# Altium PCB Knob-v1.0.PcbDoc (part 1 of 3)
Units mil, origin at the board's own origin, x right, y up, seen from the top; angles counter-clockwise.
Board outline 3346.46 x 5475.65 mil, 2 copper layers (Top Layer, Bottom Layer), stack 61.811 mil thick; 109 components, 69 nets, 369 pads, 208 vias.
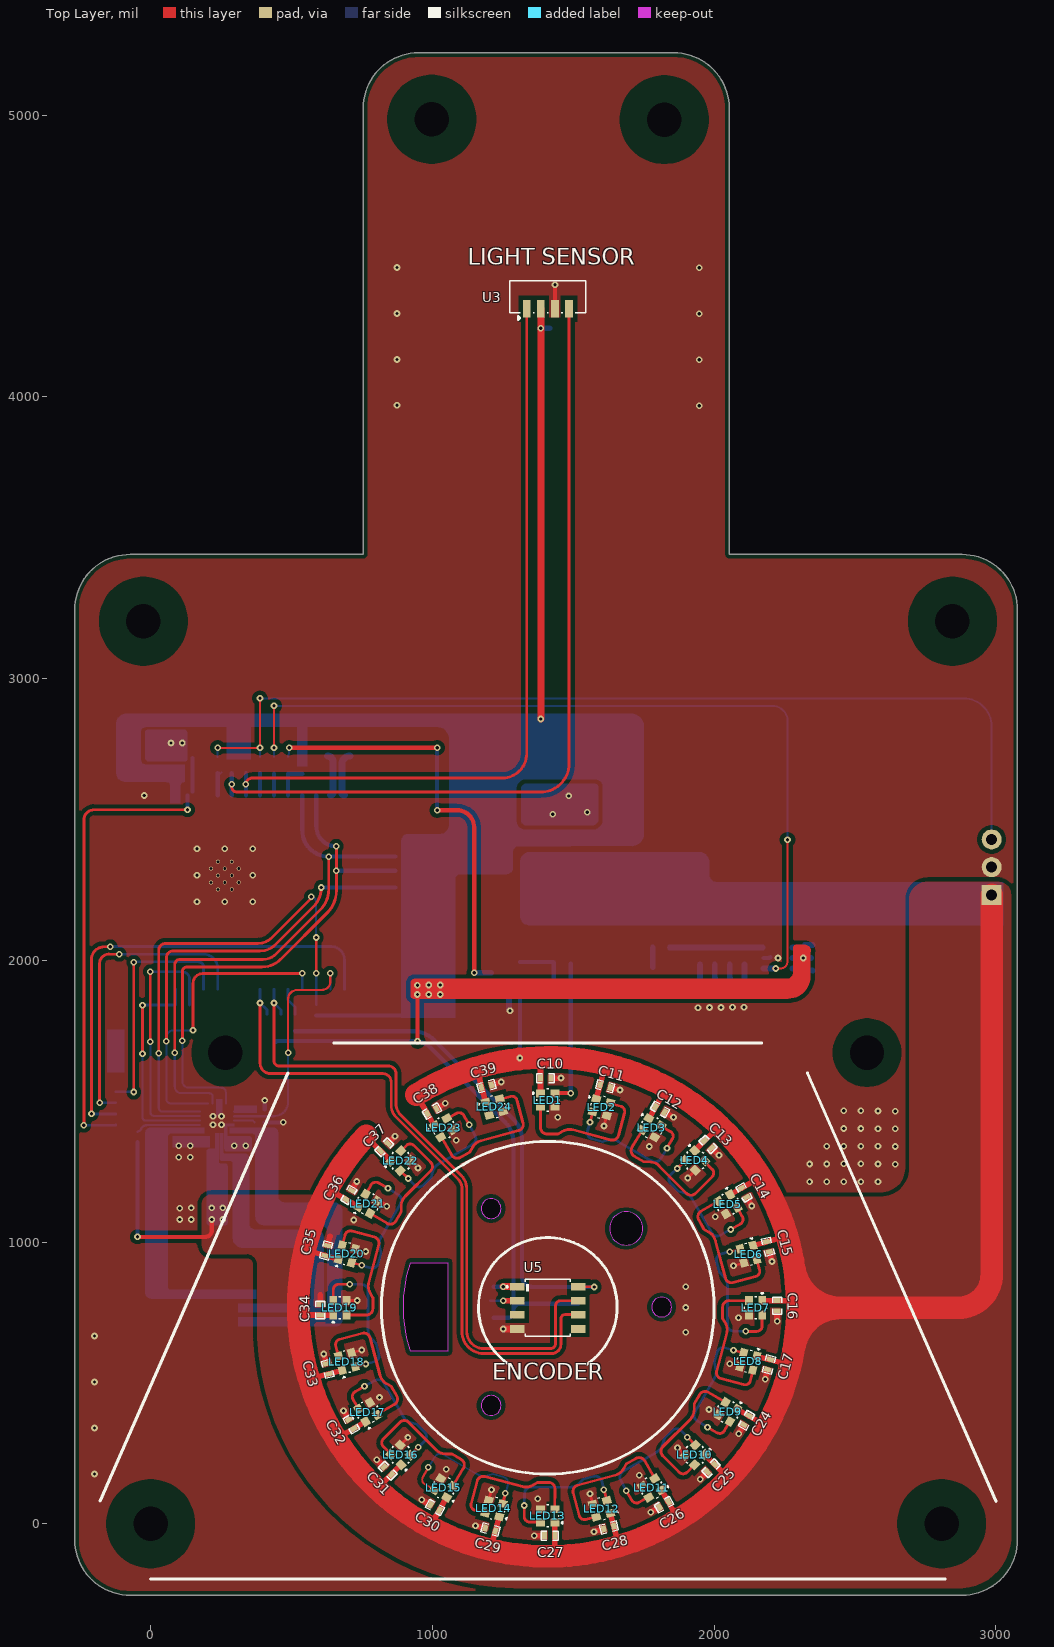
[diagram p0: Top Layer view]
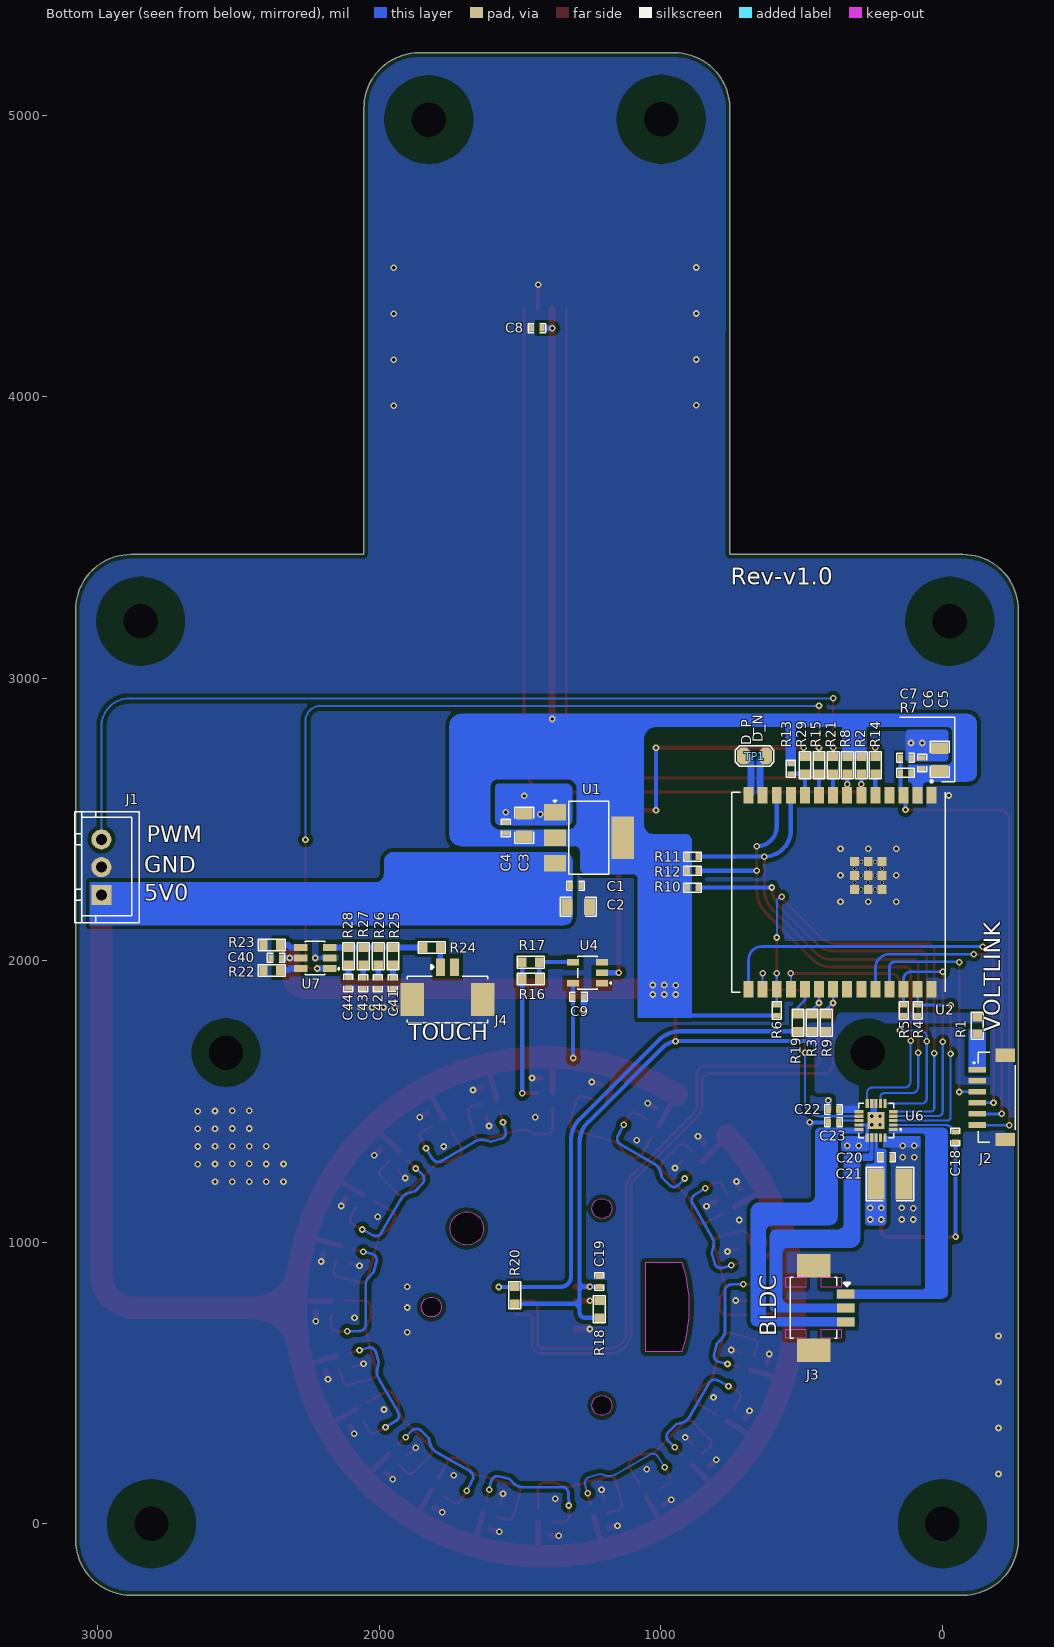
[diagram p1: Bottom Layer view, seen from below]
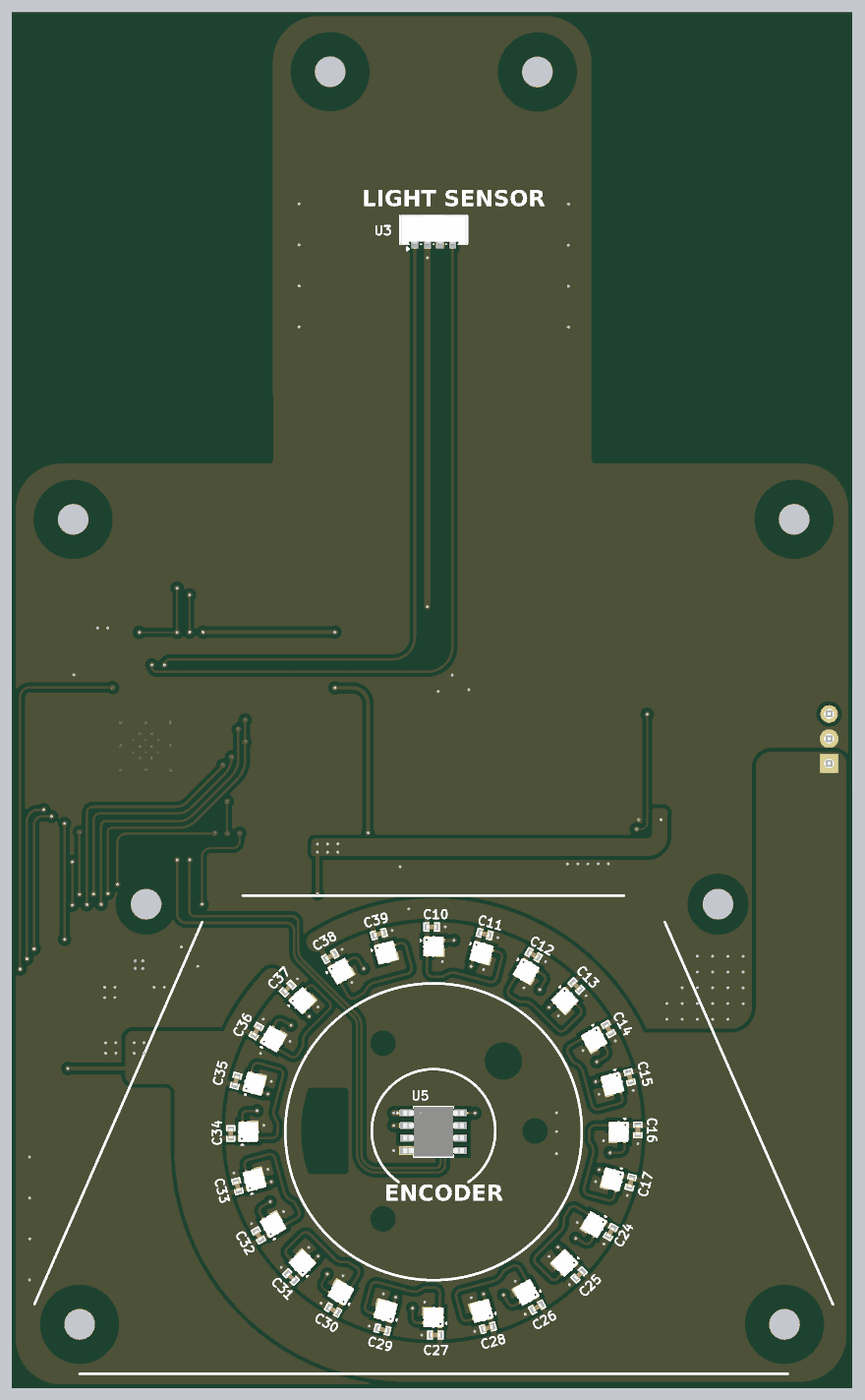
[diagram p3: 3D render of the assembled board from above, using the file's embedded part models]
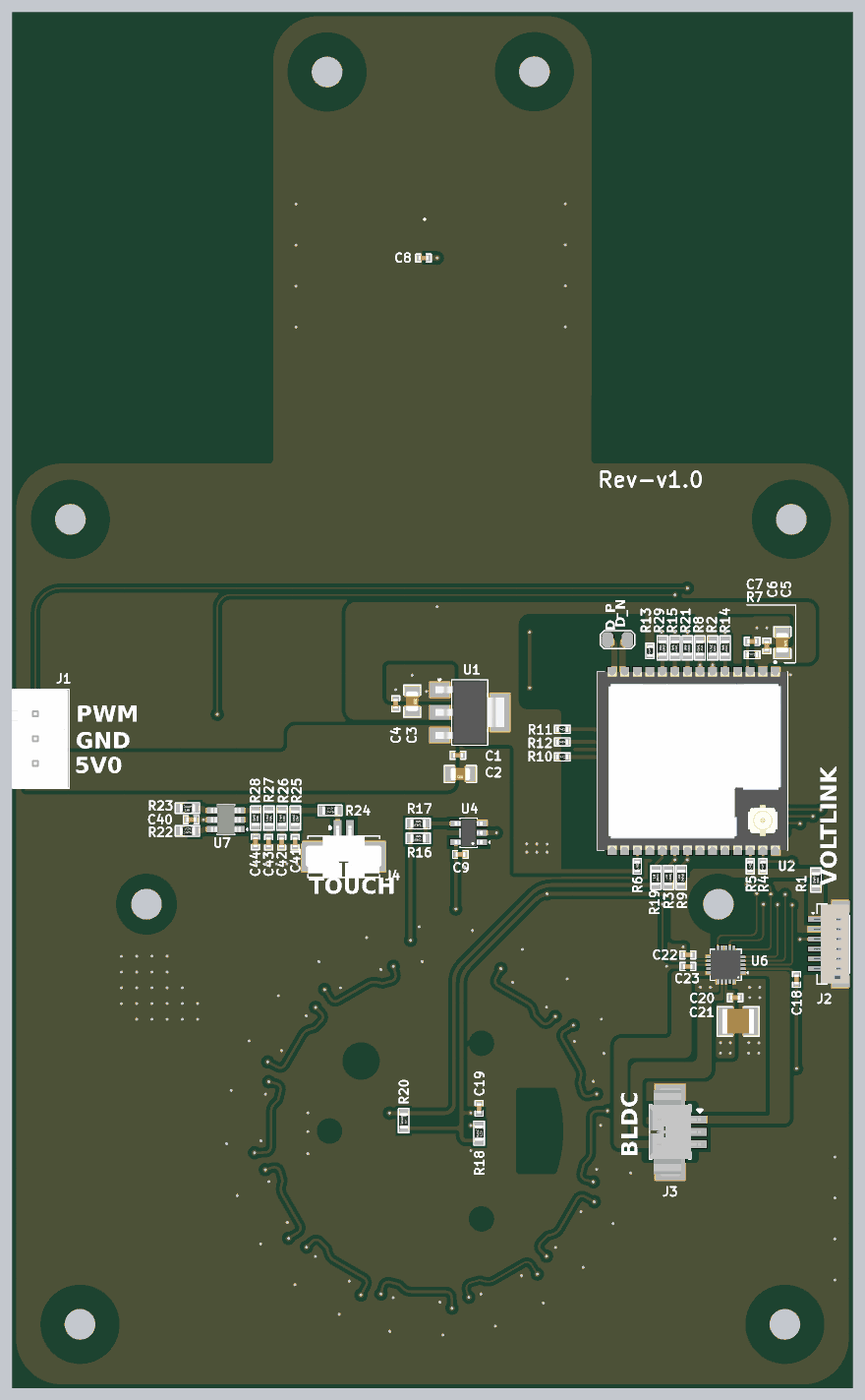
[diagram p4: 3D render of the assembled board from below, using the file's embedded part models]

## Layer stack, top to bottom
Top Solder: solder mask 0.4, Solder Resist, Dk 3.5
Top Layer: signal copper 1.378
Dielectric 1: dielectric 59.0551, FR-4, Dk 4.8
Bottom Layer: signal copper 1.378
Bottom Solder: solder mask 0.4, Solder Resist, Dk 3.5

## Board outline
-269.25,-57.09 -269.25,3244.09 cw(c-72.4,3244.09) -72.4,3440.94 755.22,3440.94 754.64,5024.78 cw(c951.49,5024.86) 951.49,5221.71 1857,5221.71 cw(c1857,5024.86) 2053.85,5024.87 2053.97,3440.94 2880.35,3440.94 cw(c2880.35,3244.09) 3077.2,3244.09 3077.2,-57.09 cw(c2880.35,-57.09) 2880.35,-253.94 -72.4,-253.94 cw(c-72.4,-57.09)
cut-out: 1778.57,769.23 ccw(c1814,769.23) 1814,733.8 ccw(c1814,769.23) 1849.44,769.23 ccw(c1814,769.23) 1814,804.66 ccw(c1814,769.23)
cut-out: 1173.2,419.72 ccw(c1208.64,419.72) 1208.64,384.29 ccw(c1208.64,419.72) 1244.07,419.72 ccw(c1208.64,419.72) 1208.64,455.16 ccw(c1208.64,419.72)
cut-out: 1173.2,1118.74 ccw(c1208.64,1118.74) 1208.64,1083.31 ccw(c1208.64,1118.74) 1244.07,1118.74 ccw(c1208.64,1118.74) 1208.64,1154.17 ccw(c1208.64,1118.74)
cut-out: 922.9,612.2 cw(c1409.88,769.68) 922.9,927.16 1055.55,927.16 1055.55,612.2
cut-out: 1629.22,1048.07 ccw(c1688.27,1048.07) 1688.27,989.02 ccw(c1688.27,1048.07) 1747.33,1048.07 ccw(c1688.27,1048.07) 1688.27,1107.13 ccw(c1688.27,1048.07)

## Design rules (kind name [scope] priority, off if disabled: settings)
BoardOutlineClearance [All] p1: gap=0 ignorepadtopadclearanceinfootprint=FALSE except(15: Poly-OutlineEdge)
Clearance [InComponent('U6')] p1: gap=10 ignorepadtopadclearanceinfootprint=TRUE except(3.9: SMDPad-Region; 4: Arc-SMDPad Track-SMDPad; 5: Track-Fill SMDPad-Fill Fill-Fill Region-Region; 7: Arc-Arc Arc-Track Arc-Region Track-Track Track-Region SMDPad-SMDPad THPad-Region Via-Region Fill-Region; 20: Arc-Poly Track-Poly SMDPad-Poly THPad-Poly Via-Poly Fill-Poly Poly-Poly Poly-Region)
Clearance Clearance_1 [All] p2: gap=10 ignorepadtopadclearanceinfootprint=TRUE except(4: Arc-Region Region-Region; 5: Arc-SMDPad Track-SMDPad Track-Fill Track-Region SMDPad-Fill SMDPad-Region Fill-Fill; 7: Arc-Arc Arc-Track Track-Track SMDPad-SMDPad; 15: Arc-Poly Track-Poly SMDPad-Poly THPad-Poly Via-Poly Fill-Poly Poly-Poly Poly-Region)
DiffPairsRouting [InDifferentialPair('USB_D')] p1: maxlimit=7 minlimit=7 mostfreqgap=7 toplayer_minwidth=25 toplayer_maxwidth=25 toplayer_prefwidth=25 bottomlayer_minwidth=25 bottomlayer_maxwidth=25 bottomlayer_prefwidth=25 impedanceprofiledriven=TRUE impedanceprofileid={D8E3C59B-97F0-4C06-8E75-F7750F7501D2} impedanceprofilevalue=90.000000 maxuncoupledlength=500
HoleSize [All] p1: absolutevalues=TRUE maxlimit=125.98 minlimit=1 maxpercent=80.000 minpercent=20.000
MinimumSolderMaskSliver [All] p1: minsoldermaskwidth=0
PolygonConnect [All] p1: connectstyle=Direct reliefconductorwidth=10 reliefentries=4 polygonreliefangle="90 Angle" airgapwidth=10
RoutingVias [All] p1: holewidth=11.81 width=23.62 viastyle="Through Hole" minholewidth=11.81 minwidth=23.62 maxholewidth=11.81 maxwidth=23.62
SilkToSilkClearance [All] p1: silktosilkclearance=0
SilkToSolderMaskClearance [IsPad] p1: minsilkscreentomaskgap=0 clearancetoexposedcopper=TRUE
SolderMaskExpansion [All] p1: expansion=4 istentingtop=FALSE
UnRoutedNet [All] p1: checkbadconnections=TRUE
Width [All] p1: maxlimit=80 minlimit=7 preferedwidth=10 minimp=50.000000 maximp=50.000000 favimp=50.000000
24 further rules are at their usual default settings.

## Classes and differential pairs
component class U_RGB_LED_Sheet: 330 C9 C10 C11 C12 C13 C14 C15 C16 C17 C24 C25 C26 C27 C28 C29 C30 C31 C32 C33 C34 C35 C36 C37 C38 C39 LED1 LED2 LED3 LED4 LED5 LED6 LED7 LED8 LED9 LED10 LED11 LED12 LED13 LED14 LED15 LED16 LED17 LED18 LED19 LED20 LED21 LED22 LED23 LED24 R16 R17 U4
component class U_Power_Sheet: C1 C2 C3 C4 J1 U1
component class U_Motor_Encoder_Sheet: C18 C19 C20 C21 C22 C23 J3 R18 R20 U5 U6
component class U_Controller_Sheet: C5 C6 C7 C8 C40 C41 C42 C43 C44 J2 J4 R1 R2 R3 R4 R5 R6 R7 R8 R9 R10 R11 R12 R13 R14 R15 R19 R21 R22 R23 R24 R25 R26 R27 R28 R29 TP1 U2 U3 U7
differential pair USB_D: +USB_D_P -USB_D_N

## Components (designator, comment, footprint, x,y, rotation, side; value= is the part's Value field where it differs from the comment)
C1 "0.1uF" Cap-0402 1302.32,2265.16 r0 bottom locked value=100nF
C2 "10uF" Cap-0805 1292.82,2190.16 r0 bottom locked
C3 "22uF" Cap-0805 1484.41,2480.16 r270 bottom locked
C4 "0.1uF" Cap-0402 1550.32,2470.16 r270 bottom locked value=100nF
C5 "10uF" Cap-0805 10.07,2712.98 r270 bottom locked
C6 "0.1uF" Cap-0402 72.13,2699.98 r270 bottom locked value=100nF
C7 "0.1uF" Cap-0402 130.34,2718.48 r0 bottom locked value=100nF
C8 "0.1uF" Cap-0402 1439.82,4244.16 r180 bottom locked value=100nF
C9 "0.1uF" Cap-0402 1292.51,1870.16 r0 bottom locked value=100nF
C10 "0.1uF" Cap-0402 1402.08,1581.82 r180 top locked value=100nF
C11 "0.1uF" Cap-0402 1613.53,1553.24 r165 top locked value=100nF
C12 "0.1uF" Cap-0402 1808.47,1470.55 r150 top locked value=100nF
C13 "0.1uF" Cap-0402 1978.7,1346.54 r135 top locked value=100nF
C14 "0.1uF" Cap-0402 2106.69,1175.24 r120 top locked value=100nF
C15 "0.1uF" Cap-0402 2191.35,983.38 r105 top locked value=100nF
C16 "0.1uF" Cap-0402 2223.86,773.72 r90 top locked value=100nF
C17 "0.1uF" Cap-0402 2195.38,565.09 r75 top locked value=100nF
C18 "0.1uF" Cap-0402 -46.25,1372.71 r270 bottom locked value=100nF
C19 "0.1uF" Cap-0402 1218.01,859.91 r270 bottom locked value=100nF
C20 "0.1uF" Cap-0402 198.14,1300.2 r0 bottom locked value=100nF
C21 "22uF" Cap-1210 186.35,1205.57 r0 bottom locked
C22 "0.1uF" Cap-0402 386.7,1470.4 r180 bottom locked value=100nF
C23 "0.1uF" Cap-0402 386.7,1424.26 r180 bottom locked value=100nF
C24 "0.1uF" Cap-0402 2115.49,367.31 r60 top locked value=100nF
C25 "0.1uF" Cap-0402 1989.72,196.91 r45 top locked value=100nF
C26 "0.1uF" Cap-0402 1822.41,67.96 r30 top locked value=100nF
C27 "0.1uF" Cap-0402 1416.86,-42.69 r0 top locked value=100nF
C28 "0.1uF" Cap-0402 1626.53,-13.75 r15 top locked value=100nF
C29 "0.1uF" Cap-0402 1206.25,-20.7 r345 top locked value=100nF
C30 "0.1uF" Cap-0402 1009.66,57.59 r330 top locked value=100nF
C31 "0.1uF" Cap-0402 842.02,188.17 r315 top locked value=100nF
C32 "0.1uF" Cap-0402 712.45,353.91 r300 top locked value=100nF
C33 "0.1uF" Cap-0402 629.03,549.77 r285 top locked value=100nF
C34 "0.1uF" Cap-0402 602.15,759.28 r270 top locked value=100nF
C35 "0.1uF" Cap-0402 623.03,969.5 r255 top locked value=100nF
C36 "0.1uF" Cap-0402 704.11,1167.24 r240 top locked value=100nF
C37 "0.1uF" Cap-0402 829.09,1336.54 r225 top locked value=100nF
C38 "0.1uF" Cap-0402 998.4,1464.54 r210 top locked value=100nF
C39 "0.1uF" Cap-0402 1192.24,1553.41 r195 top locked value=100nF
C40 "0.1uF" Cap-0402 2365.16,2008.58 r0 bottom locked value=100nF
C41 "47pF" Cap-0402 1950.93,1918.52 r90 bottom locked
C42 "30pF" Cap-0402 2004.67,1918.52 r90 bottom locked
C43 "22PF" Cap-0402 2056.67,1918.52 r90 bottom locked value=22pF
C44 "13pF" Cap-0402 2108.93,1919.71 r90 bottom locked
J1 "XH-3A" XH-3A 2985.67,2330.79 r270 bottom locked
J2 "Voltlink Target" "Voltlink Target" -173.29,1513.78 r270 bottom locked
J3 "53261-0371" 53261-0371 400.04,765.75 r270 bottom locked
J4 "53261-0271" 0532610271 1757.32,1918.31 r180 bottom locked
LED1 "SK6812-EC20" SK6812-EC20 1409.86,1503.94 r180 top locked
LED2 "SK6812-EC20" SK6812-EC20 1600.83,1478.35 r165 top locked
LED3 "SK6812-EC20" SK6812-EC20 1778.98,1405.51 r150 top locked
LED4 "SK6812-EC20" SK6812-EC20 1932.52,1289.37 r135 top locked
LED5 "SK6812-EC20" SK6812-EC20 2049.65,1133.86 r120 top locked
LED6 "SK6812-EC20" SK6812-EC20 2122.48,956.69 r105 top locked
LED7 "SK6812-EC20" SK6812-EC20 2147.61,766.41 r90 top locked
LED8 "SK6812-EC20" SK6812-EC20 2121.91,576.45 r75 top locked
LED9 "SK6812-EC20" SK6812-EC20 2048.66,396.65 r60 top locked
LED10 "SK6812-EC20" SK6812-EC20 1932.13,244.32 r45 top locked
LED11 "SK6812-EC20" SK6812-EC20 1778.98,126.97 r30 top locked
LED12 "SK6812-EC20" SK6812-EC20 1600.83,53.15 r15 top locked
LED13 "SK6812-EC20" SK6812-EC20 1409.55,27.82 r0 top locked
LED14 "SK6812-EC20" SK6812-EC20 1218.94,54.13 r345 top locked
LED15 "SK6812-EC20" SK6812-EC20 1040.59,126.87 r330 top locked
LED16 "SK6812-EC20" SK6812-EC20 887.65,244.33 r315 top locked
LED17 "SK6812-EC20" SK6812-EC20 770.73,396.19 r300 top locked
LED18 "SK6812-EC20" SK6812-EC20 696.73,575.75 r285 top locked
LED19 "SK6812-EC20" SK6812-EC20 671.92,766.53 r270 top locked
LED20 "SK6812-EC20" SK6812-EC20 696.73,957.84 r255 top locked
LED21 "SK6812-EC20" SK6812-EC20 771.1,1135.83 r240 top locked
LED22 "SK6812-EC20" SK6812-EC20 887.24,1288.39 r225 top locked
LED23 "SK6812-EC20" SK6812-EC20 1040.79,1405.51 r210 top locked
LED24 "SK6812-EC20" SK6812-EC20 1220.22,1479.47 r195 top locked
R1 "0R" Res-0603 -123.58,1768.48 r90 bottom locked
R2 "2.2K" Res-0603 288.12,2692 r90 bottom locked
R3 "2.2K" Res-0603 463.03,1778.31 r270 bottom locked
R4 "10K" Res-0402 87.87,1822.5 r90 bottom locked
R5 "10K" Res-0402 138.16,1822.5 r90 bottom locked
R6 "10K" Res-0402 588.11,1822.5 r90 bottom locked
R7 "10K" Res-0402 130.34,2664.98 r180 bottom locked
R8 "2.2K" Res-0603 338.13,2692 r90 bottom locked
R9 "2.2K" Res-0603 412.84,1778.31 r270 bottom locked
R10 "10K" Res-0402 886.88,2258.35 r180 bottom locked
R11 "10K" Res-0402 886.89,2368.11 r180 bottom locked
R12 "10K" Res-0402 886.89,2317.91 r180 bottom locked
R13 "10K" Res-0402 538.16,2679.98 r90 bottom locked
R14 "DNP" Res-0603 238.11,2692 r270 bottom locked
R15 "0R" Res-0603 438.15,2692 r270 bottom locked
R16 "DNP" Res-0603 1460.95,1933.93 r0 bottom locked
R17 "470R" Res-0603 1460.95,1992.99 r0 bottom locked
R18 "0R" Res-0603 1218.01,761.41 r90 bottom locked
R19 "0R" Res-0603 513.02,1778.35 r270 bottom locked
R20 "DNP" Res-0603 1518.32,810.52 r90 bottom locked
R21 "0R" Res-0603 388.14,2691.99 r270 bottom locked
R22 "0R" Res-0603 2380.16,1963.57 r0 bottom locked
R23 "0R" Res-0603 2380.16,2054.44 r180 bottom locked
R24 "0R" Res-0603 1812.32,2045.4 r0 bottom locked
R25 "DNP" Res-0603 1950.33,2014.89 r90 bottom locked
R26 "DNP" Res-0603 2003,2014.89 r90 bottom locked
R27 "0R" Res-0603 2055.66,2014.89 r90 bottom locked
R28 "DNP" Res-0603 2108.33,2014.89 r90 bottom locked
R29 "0R" Res-0603 488.16,2692 r270 bottom locked
TP1 "2 Test Pad" "2 Test Pad" 706,2725 r180 bottom locked
U1 "AMS1117-3.3" "SOT- 223" 1254.99,2435.27 r270 bottom locked
U2 "ESP32-C6-WROOM-1U-N8" ESP32-C6-WROOM-1U-N8 363.16,2241.71 r270 bottom locked
U3 "VEML7700-TT" VEML7700-TT 1410.28,4313.31 r0 top locked
U4 "SN74LV1T34DBVR" SOT-23-5 1259.83,1956.16 r0 bottom locked
U5 "MT6701CT-STD" SOP-8 1409.86,766.41 r0 top locked
U6 "TMC6300-LA-T" 20-QFN(3x3) 235.67,1431.1 r0 bottom locked
U7 "TTP233H-BA6" SOT-23-6 2227.09,2008.09 r0 bottom locked

## Footprints (in the part's own frame and the unit in brackets; to place one, negate y for a bottom-side part, rotate by r counter-clockwise, add the part's x,y. Pads: shape width x height; smd on the part's side, far side on the other; paste and mask are expansions set on the pad)
"2 Test Pad" [mil]
  oct 45x60 smd: 1(0,0) 2(78.74,0)
  silkscreen extent -29,-36 108,36
20-QFN(3x3) [mm]
  rect 0.8x0.3 smd: 1(-1.55,0.8) 2(-1.55,0.4) 3(-1.55,0) 4(-1.55,-0.4) 5(-1.55,-0.8) 11(1.55,-0.8) 12(1.55,-0.4) 13(1.55,0) 14(1.55,0.4) 15(1.55,0.8)
  rect 0.3x0.8 smd: 6(-0.8,-1.55) 7(-0.4,-1.55) 8(0,-1.55) 9(0.4,-1.55) 10(0.8,-1.55) 16(0.8,1.55) 17(0.4,1.55) 18(0,1.55) 19(-0.4,1.55) 20(-0.8,1.55)
  rect 1.5x1.5 smd: 21(0,0)
  silkscreen extent -2.26,-1.57 1.58,1.57, body extent -1.5,-1.5 1.5,1.5, height 0.8
53261-0371 [mm]
  rect 0.8x1.6 smd: 1(-1.25,1.45) 2(0,1.45) 3(1.25,1.45)
  rect 2.1x3 smd: SH1(-3.8,-1.45) SH2(3.8,-1.45)
  Top Layer keep-out region: 2.75,-0.75 1.934,-0.75 1.934,1.05 2.75,1.05
  Top Layer keep-out region: 2.75,-3.95 1.934,-3.95 1.934,-2.15 2.75,-2.15
  Top Layer keep-out region: -1.869,-3.95 -2.75,-3.95 -2.75,-2.15 -1.869,-2.15
  Top Layer keep-out region: -1.848,-0.75 -2.75,-0.75 -2.75,1.05 -1.848,1.05
  silkscreen extent -2.75,-3.55 2.75,1.81, body extent -4.45,-3.54 4.45,1.66, height 3.4
0532610271 [mm]
  rect 0.8x1.6 smd: 1(-0.625,1.45) 2(0.625,1.45)
  rect 2.1x3 smd: SH1(-3.175,-1.45) SH2(3.175,-1.45)
  silkscreen extent -3.62,-3.55 3.63,1.63, body extent -3.83,-3.53 3.83,1.67, height 3.4
Cap-0402 [mil]
  rect 18x25 smd mask+2.36: 1(-18.5,0) 2(18.5,0)
  silkscreen extent -31,-16 31,16, body extent -20,-10 20,10, height 19
Cap-0805 [mil] "SMD 0805"
  rect 40x60 smd mask+2.76: 1(-40,0) 2(40,0)
  silkscreen extent -64,-34 64,34, body extent -39,-25 39,25, height 30
Cap-1210 [mil] "SMD 1210"
  rect 60x110 smd: 1(-50,0) 2(50,0)
  silkscreen extent -84,-59 84,59, body extent -63,-49 63,49, height 39
ESP32-C6-WROOM-1U-N8 [mm]
  rect 1.5x0.9 smd: 1(-8.75,8.255) 2(-8.75,6.985) 3(-8.75,5.715) 4(-8.75,4.445) 5(-8.75,3.175) 6(-8.75,1.905) 7(-8.75,0.635) 8(-8.75,-0.635) 9(-8.75,-1.905) 10(-8.75,-3.175) 11(-8.75,-4.445) 12(-8.75,-5.715) 13(-8.75,-6.985) 14(-8.75,-8.255) 15(8.75,-8.255) 16(8.75,-6.985) 17(8.75,-5.715) 18(8.75,-4.445) 19(8.75,-3.175) 20(8.75,-1.905) 21(8.75,-0.635) 22(8.75,0.635) 23(8.75,1.905) 24(8.75,3.175) 25(8.75,4.445) 26(8.75,5.715) 27(8.75,6.985) 28(8.75,8.255)
  rect 0.8x0.8 smd: 29_1(-2.755,3.785) 29_2(-1.505,3.785) 29_3(-0.255,3.785) 29_4(-2.755,2.535) 29_5(-1.505,2.535) 29_6(-0.255,2.535) 29_7(-2.755,1.285) 29_8(-1.505,1.285) 29_9(-0.255,1.285)
  round 0.35 hole 0.25 mask+0: 30_1(-2.13,3.785) 30_2(-0.88,3.785) 30_3(-2.755,3.16) 30_4(-1.505,3.16) 30_5(-0.255,3.16) 30_6(-2.13,2.535) 30_7(-0.88,2.535) 30_8(-2.755,1.91) 30_9(-1.505,1.91) 30_10(-0.255,1.91) 30_11(-2.13,1.285) 30_12(-0.88,1.285)
  silkscreen extent -10.1,-9.75 9,9.5, body extent -9,-9.75 9,9.45, height 3.25
Res-0402 [mil]
  rect 18x25 smd mask+2.17: 1(-18.5,0) 2(18.5,0)
  silkscreen extent -32,-17 32,16, body extent -23,-11 23,11, height 16
Res-0603 [mil]
  rect 30x35 smd: 1(-30,0) 2(30,0)
  silkscreen extent -48,-21 48,21, body extent -31,-17 31,17, height 18
SK6812-EC20 [mm]
  rect 0.8x0.7 smd: 1(0.65,-0.6) 2(0.65,0.6) 3(-0.65,0.6) 4(-0.65,-0.6)
  silkscreen extent -1,-1 1.35,1, body extent -1,-1 1,1, height 0.65
SOP-8 [mm]
  rect 1.3x0.7 smd: 1(-2.75,1.905) 2(-2.75,0.635) 3(-2.75,-0.635) 4(-2.75,-1.905) 5(2.75,-1.905) 6(2.75,-0.635) 7(2.75,0.635) 8(2.75,1.905)
  silkscreen extent -3.69,-2.57 2.03,2.57, body extent -3.1,-2.5 3.1,2.5, height 1.76
SOT-23-5 [mm]
  rect 1.1x0.6 smd: 1(-1.3,0.95) 2(-1.3,0) 3(-1.3,-0.95) 4(1.3,-0.95) 5(1.3,0.95)
  silkscreen extent -2.13,-1.5 0.88,1.5, body extent -1.4,-1.45 1.4,1.45, height 1.45
SOT-23-6 [mm]
  rect 1.22x0.62 smd: 1(-1.31,0.95) 2(-1.31,0) 3(-1.31,-0.95) 4(1.31,-0.95) 5(1.31,0) 6(1.31,0.95)
  silkscreen extent -2.18,-1.52 0.86,1.52, body extent -1.5,-1.5 1.5,1.5, height 1.47
"SOT- 223" [mm]
  rect 1.5x2 smd: 1(-2.3,-3.05) 2(0,-3.05) 3(2.3,-3.05)
  rect 3.8x2 smd: 4(0,3.05)
  silkscreen extent -3.35,-3.2 3.3,1.8, body extent -3.25,-3.5 3.25,3.5, height 1.61
VEML7700-TT [mm]
  rect 0.7x1.6 smd paste+0 mask+0.05: 1(-1.905,0) 2(-0.635,0) 3(0.635,0) 4(1.905,0)
  silkscreen extent -3.43,-0.97 3.43,2.54, body extent -3.4,-0.46 3.4,2.54, height 2.35
"Voltlink Target" [mm]
  rect 0.5x1.6 smd: 1(-2.5,-1.262) 2(-1.5,-1.262) 3(-0.5,-1.262) 4(0.5,-1.262) 5(1.5,-1.262) 6(2.5,-1.262)
  rect 1.2x1.8 smd: MP1(-3.8,1.262) MP2(3.8,1.263)
  silkscreen extent -4.06,-1.68 4.06,2.17, body extent -4,-1.49 4,2.11, height 4.25
XH-3A [mm]
  rect 1.8x1.8 hole 1 paste-2539.97 mask+0.05: 1(2.5,0)
  round 1.8 hole 1 paste-2539.97 mask+0.05: 2(0,0) 3(-2.5,0)
  silkscreen extent -5,-2.4 5,3.4, body extent -5,-2.4 5,3.3, height 7

## Part data
C1 C4 C6 C8 C9 C10 C11 C12 C13 C14 C15 C16 C17 C18 C19 C20 C22 C23 C24 C25 C26 C27 C28 C29 C30 C31 C32 C33 C34 C35 C36 C37 C38 C39 C40: library part GRM155R71E104KE14D, "CAP CER 0.1UF 25V X7R 0402", Case Code (Imperial)=0402, Case Code (Metric)=1005, Dielectric=X7R, Dielectric Material=Ceramic, LCSC Part Number=C77014, Manufacturer=Murata, Max Operating Temperature=125°C, Min Operating Temperature=-55°C, Package Quantity=10000, Tolerance=10%, Voltage=25V, Case/Package=0402, ComponentLink1Description=http://www.farnell.com/datasheets/1872206.pdf?src-supplier=Farnell, ComponentLink1URL=http://www.farnell.com/datasheets/1872206.pdf?src-supplier=Farnell, ComponentLink2Description=http://www.mouser.com/ds/2/281/c02e-2905.pdf?src-supplier=Mouser, ComponentLink2URL=http://www.mouser.com/ds/2/281/c02e-2905.pdf?src-supplier=Mouser, ComponentLink3Description=http://uk.rs-online.com/webdocs/144c/0900766b8144c113.pdf?src-supplier=Rs, ComponentLink3URL=http://uk.rs-online.com/webdocs/144c/0900766b8144c113.pdf?src-supplier=Rs, ComponentLink4Description=https://datasheet.octopart.com/GRM155R71E104KE14D-Murata-datasheet-62346597.pdf?src-supplier=Future+Electronics, ComponentLink4URL=https://datasheet.octopart.com/GRM155R71E104KE14D-Murata-datasheet-62346597.pdf?src-supplier=Future+Electronics, ComponentLink5Description=https://search.murata.co.jp/Ceramy/image/img/A01X/G101/ENG/GRM155R71E104KE14-01.pdf?src-supplier=Digikey, ComponentLink5URL=https://search.murata.co.jp/Ceramy/image/img/A01X/G101/ENG/GRM155R71E104KE14-01.pdf?src-supplier=Digikey, ComponentLink6Description=http://www.farnell.com/datasheets/2048008.pdf?src-supplier=Newark, ComponentLink6URL=http://www.farnell.com/datasheets/2048008.pdf?src-supplier=Newark, ComponentLink7Description=https://datasheet.octopart.com/GRM155R71E104KE14D-Murata-datasheet-62317124.pdf?src-supplier=Element14, ComponentLink7URL=https://datasheet.octopart.com/GRM155R71E104KE14D-Murata-datasheet-62317124.pdf?src-supplier=Element14, ComponentLink8Description=http://psearch.en.murata.com/capacitor/product/GRM155R71E104KE14%23.pdf?src-supplier=Avnet, ComponentLink8URL=http://psearch.en.murata.com/capacitor/product/GRM155R71E104KE14%23.pdf?src-supplier=Avnet, Depth=0.5mm, Height=0.5mm, Item Type=Capacitors, Lead Free=5697LeadFree, Length=1mm, Manufacturer Part Number=GRM155R71E104KE14D, Material=4241ConductorMaterial, Mounting Technology="Surface Mount", Packaging="Tape and Reel", Pins=2NUMBER, Pricing="1=0.1, 10=0.007, 50=0.007, 100=0.005, 1000=0.005, 10000=0.004 (USD)", Reach SVHC Compliant=Unknown, RoHS=Yes, RoHS Compliant=Yes, Series=GRM, Stock=652368, Supplier=Mouser, Termination=SMD/SMT, Thickness=0.022inch, Voltage Rating=25V, Voltage Rating (DC)=25V, Weight=0.000212oz, Width=0.02inch
C2 C5: library part GRM21BZ71E106KE15L, "CAP CER 10UF 25V X7R 0805", Case/Package=339Case, LCSC Part Number=C237493, Manufacturer=Murata, Max Operating Temperature=125°C, Min Operating Temperature=-55°C, Tolerance=10%, Voltage Rating=25V, Height=1.45mm, Item Type=Capacitors, Length=2mm, Manufacturer Part Number=GRM21BZ71E106KE15L, Material=4241ConductorMaterial, Pricing="1=0.34, 10=0.142, 50=0.142, 100=0.096, 1000=0.086, 10000=0.058 (USD)", RoHS=Yes, RoHS Compliant=Yes, Stock=43117, Supplier=Mouser, Thickness=1.25mm, Width=1.25mm
C3: library part GRM21BZ71A226ME15L, "CAP CER 22UF 10V X7R 0805", LCSC Part Number=C907991, Manufacturer=Murata, Max Operating Temperature=125°C, Min Operating Temperature=-55°C, Package=0805, Supplier Part Number=490-GRM21BZ71A226ME15LCT-ND, Tolerance=20%, Voltage Rating=10V, Category="Ceramic Capacitors", ComponentLink1Description=https://datasheet.octopart.com/GRM21BZ71A226ME15L-Murata-datasheet-165579666.pdf?src-supplier=TME, ComponentLink1URL=https://datasheet.octopart.com/GRM21BZ71A226ME15L-Murata-datasheet-165579666.pdf?src-supplier=TME, ComponentLink2Description=LCSC, ComponentLink2URL=https://www.lcsc.com/product-detail/Multilayer-Ceramic-Capacitors-MLCC-SMD-SMT_Murata-Electronics-GRM21BZ71A226ME15L_C907991.html, Height=1.45mm, Item Type=Capacitor, Length=2mm, Manufacturer Part Number=GRM21BZ71A226ME15L, Material=4241ConductorMaterial, Pricing="1=0.39, 10=0.259, 50=0.191, 100=0.1556, 500=0.12282, 1000=0.10372 (USD)", RoHS=Yes, Stock=49126, Supplier=Digi-Key, Thickness=1.25mm, Width=1.25mm
C7: library part GRM155R71C104KA88D, "CAP CER 0.1UF 16V X7R 0402", Case Code (Imperial)=0402, Case Code (Metric)=1005, Dielectric=X7R, Dielectric Material=Ceramic, Insulation Resistance=10GR, LCSC Part Number=C71629, Manufacturer=Murata, Max Operating Temperature=125°C, Min Operating Temperature=-55°C, Package Quantity=1, Tolerance=10%, Voltage=16V, Case/Package=0402, Category="Ceramic Capacitors", ComponentLink1Description=https://datasheet.ciiva.com/129/grm155r71c104ka88-01-129739.pdf?src-supplier=Digi-Key, ComponentLink1URL=https://datasheet.ciiva.com/129/grm155r71c104ka88-01-129739.pdf?src-supplier=Digi-Key, ComponentLink2Description=https://datasheet.ciiva.com/129/grm155r71c104ka88-01-129740.pdf?src-supplier=Digi-Key, ComponentLink2URL=https://datasheet.ciiva.com/129/grm155r71c104ka88-01-129740.pdf?src-supplier=Digi-Key, ComponentLink3Description=https://datasheet.ciiva.com/18102/getdatasheetpartid-85307-18102905.pdf?src-supplier=Verical, ComponentLink3URL=https://datasheet.ciiva.com/18102/getdatasheetpartid-85307-18102905.pdf?src-supplier=Verical, ComponentLink4Description=https://datasheet.ciiva.com/29199/454098-da-01-en-vs-kondensator-0402-29199799.pdf?src-supplier=Conrad, ComponentLink4URL=https://datasheet.ciiva.com/29199/454098-da-01-en-vs-kondensator-0402-29199799.pdf?src-supplier=Conrad, ComponentLink5Description=https://datasheet.ciiva.com/7937/4360-7937615.pdf?src-supplier=Element14, ComponentLink5URL=https://datasheet.ciiva.com/7937/4360-7937615.pdf?src-supplier=Element14, ComponentLink6Description=https://datasheet.ciiva.com/14116/grmseries-highdielectrictype-eng-14116878.pdf?src-supplier=Distrelec, ComponentLink6URL=https://datasheet.ciiva.com/14116/grmseries-highdielectrictype-eng-14116878.pdf?src-supplier=Distrelec, ComponentLink7Description=https://datasheet.ciiva.com/14103/grmseries-highdielectrictype-eng-14103750.pdf?src-supplier=Distrelec, ComponentLink7URL=https://datasheet.ciiva.com/14103/grmseries-highdielectrictype-eng-14103750.pdf?src-supplier=Distrelec, ComponentLink8Description=https://datasheet.ciiva.com/28534/4360-28534127.pdf?src-supplier=Element14, ComponentLink8URL=https://datasheet.ciiva.com/28534/4360-28534127.pdf?src-supplier=Element14, ComponentLink9Description=https://datasheet.ciiva.com/28534/4360-28534133.pdf?src-supplier=Element14, ComponentLink9URL=https://datasheet.ciiva.com/28534/4360-28534133.pdf?src-supplier=Element14, ComponentLink10Description=https://datasheet.ciiva.com/16199/product-16199000.pdf?src-supplier=Future+Electronics, ComponentLink10URL=https://datasheet.ciiva.com/16199/product-16199000.pdf?src-supplier=Future+Electronics, Depth=0.5mm, Height=0.5mm, Item Type=Capacitor, Lead Free="Lead Free", Length=1mm, Manufacturer Part Number=GRM155R71C104KA88D, Material=Ceramic, Mounting Technology="Surface Mount", Packaging="Tape and Reel", Pins=2, Pricing 1="10000=0.00480, 30000=0.00470, 100000=0.00350, 250000=0.00330 (USD)", Radiation Hardening=No, RoHS=Yes, RoHS Compliant=Yes, Series=GRM, Stock 1=1690322, Supplier 1="Arrow Electronics", Supplier Part Number 1=GRM155R71C104KA88D, Termination=SMD/SMT, Thickness=0.022inch, Voltage Rating=16V, Voltage Rating (DC)=16V, Width=0.02inch
C21: library part GRM32ER71E226KE15L, "CAP CER 22UF 25V X7R 1210", Color=46Colour, Current Rating=3A, LCSC Part Number=C21397, Manufacturer=Murata, ComponentLink1Description=https://datasheet.ciiva.com/16497/product-16497009.pdf?src-supplier=Future+Electronics, ComponentLink1URL=https://datasheet.ciiva.com/16497/product-16497009.pdf?src-supplier=Future+Electronics, ComponentLink2Description=https://datasheet.ciiva.com/6072/1697714-6072768.pdf?src-supplier=Farnell, ComponentLink2URL=https://datasheet.ciiva.com/6072/1697714-6072768.pdf?src-supplier=Farnell, ComponentLink3Description=https://datasheet.ciiva.com/3776/2741grm32er71e226ke1523-3776996.pdf?src-supplier=Arrow+Electronics, ComponentLink3URL=https://datasheet.ciiva.com/3776/2741grm32er71e226ke1523-3776996.pdf?src-supplier=Arrow+Electronics, ComponentLink4Description=https://datasheet.ciiva.com/11789/0900766b80ef921d-11789129.pdf?src-supplier=Rs, ComponentLink4URL=https://datasheet.ciiva.com/11789/0900766b80ef921d-11789129.pdf?src-supplier=Rs, ComponentLink5Description=https://datasheet.ciiva.com/29201/451826-da-01-de-vs-kondens-grm32-er71e-226ke15l-29201795.pdf?src-supplier=Conrad, ComponentLink5URL=https://datasheet.ciiva.com/29201/451826-da-01-de-vs-kondens-grm32-er71e-226ke15l-29201795.pdf?src-supplier=Conrad, ComponentLink6Description=https://datasheet.ciiva.com/22703/1697714-22703397.pdf?src-supplier=Element14, ComponentLink6URL=https://datasheet.ciiva.com/22703/1697714-22703397.pdf?src-supplier=Element14, ComponentLink7Description=https://datasheet.ciiva.com/175/partnumbering-e-01-175746.pdf?src-supplier=Digikey, ComponentLink7URL=https://datasheet.ciiva.com/175/partnumbering-e-01-175746.pdf?src-supplier=Digikey, ComponentLink8Description=https://datasheet.ciiva.com/175/partnumbering-e-01-175747.pdf?src-supplier=Digikey, ComponentLink8URL=https://datasheet.ciiva.com/175/partnumbering-e-01-175747.pdf?src-supplier=Digikey, ComponentLink9Description=https://datasheet.ciiva.com/175/partnumbering-e-01-175748.pdf?src-supplier=Digikey, ComponentLink9URL=https://datasheet.ciiva.com/175/partnumbering-e-01-175748.pdf?src-supplier=Digikey, Contact Material=150ConductorMaterial, Contact Plating=157ConductorMaterial, Gender=29Gender, Item Type=Capacitors, Lead Free=5697LeadFree, Lead Pitch=2.54mm, Manufacturer Part Number=GRM32ER71E226KE15L, Pricing="1=0.78, 10=0.39, 50=0.39, 100=0.351, 1000=0.297, 10000=0.267 (USD)", RoHS=Yes, Stock=50822, Supplier=Mouser
C41: library part GCM1555C1H470FA16D, "CAP CER 47PF 50V C0G/NP0 0402", Case Code (Imperial)=0402, Case Code (Metric)=1005, LCSC Part Number=C393684, Manufacturer=Murata, Max Operating Temperature=125°C, Min Operating Temperature=-55°C, Ratings=AEC-Q200, Supplier Part Number 1=490-16445-1-ND, Tolerance=1%, Voltage Rating=50V, Capacitance=47pF, Case/Package=0402, Category="Ceramic Capacitors", ComponentLink1Description=http://search.murata.co.jp/Ceramy/image/img/A01X/G101/ENG/GCM1555C1H470FA16-01.pdf?src-supplier=Digi-Key, ComponentLink1URL=http://search.murata.co.jp/Ceramy/image/img/A01X/G101/ENG/GCM1555C1H470FA16-01.pdf?src-supplier=Digi-Key, Manufacturer Part Number=GCM1555C1H470FA16D, Mount="Surface Mount", Packaging="Tape and Reel", Pricing 1="1=0.11000, 10=0.07900, 50=0.04500, 100=0.03730, 500=0.02618, 1000=0.02168, 2500=0.02018, 5000=0.01846 (USD)", RoHS=No, Stock 1=27098, Supplier 1=Digi-Key
C42: library part CC0402JRNPO9BN300, "CAP CER 30PF 50V C0G/NPO 0402", Manufacturer=Yageo, Supplier Part Number 1=6784771, Temperature Coefficient=30ppm/°C, Category="Ceramic Capacitors", ComponentLink1Description=https://datasheet.ciiva.com/13263/upy-gp-np0-16v-to-50v-8-3714-13263961.pdf?src-supplier=Mouser, ComponentLink1URL=https://datasheet.ciiva.com/13263/upy-gp-np0-16v-to-50v-8-3714-13263961.pdf?src-supplier=Mouser, Halogen Free=5694HalogenFree, Item Type=Capacitor, Manufacturer Part Number=CC0402JRNPO9BN300, Pricing 1="10000=0.0025, 40000=0.0024, 150000=0.0023, 400000=0.0022, 1000000=0.0021 (USD)", RoHS=Yes, Stock 1=540000, Supplier 1="Future Electronics"
C43: library part CC0402JRNPO9BN220, "CAP CER 22PF 50V C0G/NPO 0402", Case Code (Imperial)=0402, Case Code (Metric)=1005, Dielectric=C0G, Dielectric Material=Ceramic, Insulation Resistance=100GR, LCSC Part Number=C106203, Manufacturer=Yageo, Max Operating Temperature=125°C, Min Operating Temperature=-55°C, Package Quantity=1, Supplier Part Number 1=9105957, Temperature Coefficient=30ppm/°C, Tolerance=5%, Voltage=50V, Case/Package=0402, Category="Ceramic Capacitors", ComponentLink1Description=https://datasheet.ciiva.com/5789/1443161-5789509.pdf?src-supplier=Farnell, ComponentLink1URL=https://datasheet.ciiva.com/5789/1443161-5789509.pdf?src-supplier=Farnell, ComponentLink2Description=https://datasheet.ciiva.com/8033/1443161-8033606.pdf?src-supplier=Element14, ComponentLink2URL=https://datasheet.ciiva.com/8033/1443161-8033606.pdf?src-supplier=Element14, ComponentLink3Description=https://datasheet.ciiva.com/7656/1132289-7656615.pdf?src-supplier=Element14, ComponentLink3URL=https://datasheet.ciiva.com/7656/1132289-7656615.pdf?src-supplier=Element14, ComponentLink4Description=https://datasheet.ciiva.com/8033/1443161-8033607.pdf?src-supplier=Element14, ComponentLink4URL=https://datasheet.ciiva.com/8033/1443161-8033607.pdf?src-supplier=Element14, ComponentLink5Description=https://datasheet.ciiva.com/8033/1443161-8033605.pdf?src-supplier=Element14, ComponentLink5URL=https://datasheet.ciiva.com/8033/1443161-8033605.pdf?src-supplier=Element14, ComponentLink6Description=https://datasheet.ciiva.com/143/mlccorderingcode-143987.pdf?src-supplier=Digi-Key, ComponentLink6URL=https://datasheet.ciiva.com/143/mlccorderingcode-143987.pdf?src-supplier=Digi-Key, ComponentLink7Description=https://datasheet.ciiva.com/143/mlccorderingcode-143986.pdf?src-supplier=Digi-Key, ComponentLink7URL=https://datasheet.ciiva.com/143/mlccorderingcode-143986.pdf?src-supplier=Digi-Key, ComponentLink8Description=https://datasheet.ciiva.com/143/mlccorderingcode-143988.pdf?src-supplier=Digi-Key, ComponentLink8URL=https://datasheet.ciiva.com/143/mlccorderingcode-143988.pdf?src-supplier=Digi-Key, ComponentLink9Description=https://datasheet.ciiva.com/5425/upy-gp-np0-16v-to-50v-8-5425483.pdf?src-supplier=Mouser, ComponentLink9URL=https://datasheet.ciiva.com/5425/upy-gp-np0-16v-to-50v-8-5425483.pdf?src-supplier=Mouser, ComponentLink10Description=https://datasheet.ciiva.com/15189/getdatasheetpartid-370074-15189117.pdf?src-supplier=Verical, ComponentLink10URL=https://datasheet.ciiva.com/15189/getdatasheetpartid-370074-15189117.pdf?src-supplier=Verical, Depth=0.5mm, Height=0.5mm, Item Type=Capacitor, Lead Free="Lead Free", Length=1mm, Manufacturer Part Number=CC0402JRNPO9BN220, Mounting Technology="Surface Mount", Packaging="Tape and Reel", Pins=2, Pricing 1="10000=0.00220, 40000=0.00210, 150000=0.00200, 400000=0.00190, 1000000=0.00180 (USD)", Radiation Hardening=No, Reach SVHC Compliant=Yes, Resistor Type=Ceramic, RoHS=Yes, RoHS Compliant=Yes, Series=CC, Stock 1=200000, Supplier 1="Future Electronics", Termination=SMD/SMT, Thickness=0.022inch, Voltage Rating=50V, Voltage Rating (DC)=50V, Width=0.02inch
C44: library part CC0402FRNPO9BN130, "CAP CER 13PF 50V C0G/NP0 0402", LCSC Part Number=C541433, Manufacturer=Yageo, Item Type=Capacitors, Manufacturer Part Number=CC0402FRNPO9BN130, Pricing="10000=0.00937 (USD)", RoHS=No, Supplier=Digikey
J1: "1x3P 3P XH 1 Tin 2.5mm 3 -25℃~+85℃ Brass 3A Straight Plugin,P=2.5mm Wire To Board Connector ROHS", LCSC Part Number=C2908601, Manufacturer=HCTL, Package=Plugin,P=2.5mm, Item Type="Wire To Board Connector", Manufacturer Part Number=XH-3A
J2: library part C145963, "1x6P SH 1 1mm 6 SMD,P=1mm Wire To Board / Wire To Wire Connector ROHS", Manufacturer=BOOMELE, Package=SMD,P=1mm, ComponentLink1Description=LCSC, ComponentLink1URL=https://www.lcsc.com/product-detail/Wire-To-Board-Wire-To-Wire-Connector_BOOMELE-Boom-Precision-Elec-C145963_C145963.html, Item Type=Connector, LCSC Part Number=C145963, Manufacturer Part Number=C145963
J3: "CONN HEADER SMD R/A 3POS 1.25MM", Color=Natural, Contact Resistance=20mR, Current Rating=1A, Flammability Rating="UL94 V-0", Insulation Resistance=100MR, LCSC Part Number=C293630, Manufacturer=Molex, Manufacturer Series=53261, Max Operating Temperature=85°C, Min Operating Temperature=-40°C, Voltage Rating=125V, ComponentLink1Description=https://datasheet.ciiva.com/3932/333250532610371-pcb-headers-3932824.pdf?src-supplier=Arrow+Electronics, ComponentLink1URL=https://datasheet.ciiva.com/3932/333250532610371-pcb-headers-3932824.pdf?src-supplier=Arrow+Electronics, ComponentLink2Description=https://datasheet.ciiva.com/34302/1302094-34302177.pdf?src-supplier=Jameco, ComponentLink2URL=https://datasheet.ciiva.com/34302/1302094-34302177.pdf?src-supplier=Jameco, Contact Gender=Male, Contact Material=Bronze,Tin, Contact Plating=Tin, Contact Type="Blade Pin", Depth=5.2mm, DIN Conformance=No, Filter Feature=No, Gender=Male, Glow Wire Compliant=Non-compliant, Housing Color=Natural, Housing Material=Nylon, IEC Conformance=No, Item Type="Headers and Wire Housings", Lead Free="Lead Free", Length=8.9mm, Manufacturer Part Number=53261-0371, MIL Conformance=No, Mixed Contacts=No, Mounting Style=STRAIGHT, Mounting Technology="Surface Mount,Board", Number of Circuits=2, Number of Contacts=3, Number of Positions=3, Number of Rows=1, Number of Rows Loaded=1, Option="General Purpose", Orientation="Right Angle", Packaging="Tape and Reel", Pitch=1.25mm, Plating=Tin, Pricing="1600=0.3964 (USD)", Radiation Hardening=No, Reach SVHC Compliant=Unknown, RoHS=Yes, RoHS Compliant=Yes, Series=PicoBlade, Stock=442600, Supplier="Arrow Electronics", Termination=Solder, Voltage Rating (AC)=125V, Voltage Rating (DC)=125V, Working Voltage=125V
J4: "CONN HEADER SMD R/A 2POS 1.25MM", Color=Beige, Contact Resistance=20mR, Current Rating=1A, Flammability Rating="UL94 V-0", Housing Color=Natural, Insulation Resistance=100MR, LCSC Part Number=C177225, Manufacturer=Molex, Max Operating Temperature=85°C, Min Operating Temperature=-40°C, Package Quantity=1000, Voltage Rating=125V, ComponentLink1Description=https://datasheet.ciiva.com/7167/1626147-7167496.pdf?src-supplier=Newark, ComponentLink1URL=https://datasheet.ciiva.com/7167/1626147-7167496.pdf?src-supplier=Newark, ComponentLink2Description=https://datasheet.ciiva.com/34303/1932547-34303342.pdf?src-supplier=Jameco, ComponentLink2URL=https://datasheet.ciiva.com/34303/1932547-34303342.pdf?src-supplier=Jameco, ComponentLink3Description=https://datasheet.ciiva.com/7920/1887027-7920826.pdf?src-supplier=Element14, ComponentLink3URL=https://datasheet.ciiva.com/7920/1887027-7920826.pdf?src-supplier=Element14, ComponentLink4Description=https://datasheet.ciiva.com/22683/1626147-22683562.pdf?src-supplier=Element14, ComponentLink4URL=https://datasheet.ciiva.com/22683/1626147-22683562.pdf?src-supplier=Element14, ComponentLink5Description=https://datasheet.ciiva.com/46393/1808526-46393547.pdf?src-supplier=Element14, ComponentLink5URL=https://datasheet.ciiva.com/46393/1808526-46393547.pdf?src-supplier=Element14, Connector Type=Header, Contact Finish - Mating=TIN, Contact Material=Bronze,Tin, Contact Plating=Tin, Contact Shape=Rectangular, Contact Type="Blade Pin", Depth=5.2mm, Fastening Type=Detent, Gender=Male, Glow Wire Compliant=Non-compliant, Housing Material=Nylon, Insulation Color=Natural, Insulation Material=Nylon, Item Type="Headers and Wire Housings", Lead Free="Lead Free", Lead Pitch=1.25mm, Manufacturer Part Number=53261-0271, Mounting Technology="Surface Mount", Number of Circuits=2, Number of Contacts=2, Number of Positions=2, Number of Rows=1, Orientation="Right Angle", Packaging="Tape and Reel", Pitch=1.25mm, Plating=Tin, Pricing="1000=0.4221, 2000=0.4184, 3000=0.4147, 4000=0.411, 5000=0.4073, 10000=0.4035 (USD)", Radiation Hardening=No, Reach SVHC Compliant=Unknown, RoHS=Yes, RoHS Compliant=Yes, Series=PicoBlade, Stock=107200, Supplier="Arrow Electronics", Termination=Solder, Voltage Rating (AC)=125V, Voltage Rating (DC)=125V, Working Voltage=125V
LED1 LED2 LED3 LED4 LED5 LED6 LED7 LED8 LED9 LED10 LED11 LED12 LED13 LED14 LED15 LED16 LED17 LED18 LED19 LED20 LED21 LED22 LED23 LED24: "5mA -40℃~+80℃ RGB SMD,2x2mm Light Emitting Diodes (LED) ROHS", LCSC Part Number=C2909058, Manufacturer="OPSCO Optoelectronics", Package=SMD,2x2mm, ComponentLink1Description=LCSC, ComponentLink1URL=https://www.lcsc.com/product-detail/Light-Emitting-Diodes-LED_OPSCO-Optoelectronics-SK6812-EC20_C2909058.html, Item Type="RGB LED", Manufacturer Part Number=SK6812-EC20
R1 R14 R15 R16 R18 R19 R20 R21 R22 R23 R24 R25 R26 R27 R28 R29: library part RC0603JR-070RL, "RES 0 OHM JUMPER 1/10W 0603", Case Code (Imperial)=0603, Case Code (Metric)=1608, LCSC Part Number=C95177, Manufacturer=Yageo, Max Operating Temperature=155°C, Max Power Dissipation=100mW, Min Operating Temperature=-55°C, Package Quantity=5000, Resistance=0mR, Resistance Tolerance=5%, Resistor Type="Thick Film", Supplier Part Number 1=311-0.0GRCT-ND, Temperature Coefficient=200ppm/°C, Tolerance=1%, Voltage Rating=50V, Case/Package=0603, Category="Chip SMD Resistors", Construction=Rectangular, Contact Plating=Tin,Matte, Depth=0.8mm, Features="Moisture Resistant", Height=0.45mm, Item Type=Resistor, Lead Free="Lead Free", Length=1.6mm, Manufacturer Part Number=RC0603JR-070RL, Military Standard=Not, Number of Pins=2, Number of Terminations=2, Packaging="Tape and Reel", Power Rating=100mW, Pricing 1="1=0.10000, 10=0.01700, 25=0.01240, 50=0.00960, 100=0.00700, 250=0.00536, 500=0.00430, 1000=0.00316 (USD)", Radiation Hardening=No, Reach SVHC Compliant="No SVHC", RoHS=Yes, RoHS Compliant=Yes, Series=RC, Size Code=0603, Stock 1=18081776, Supplier 1=Digi-Key, Technology="THICK FILM", Termination=SMD/SMT, Voltage Rating (DC)=50V, Width=0.8mm
R2 R3 R8 R9: library part RC0603FR-072K2L, "RES 2.2K OHM 1% 1/10W 0603", Case Code (Imperial)=0603, Case Code (Metric)=1608, LCSC Part Number=C114662, Manufacturer=Yageo, Max Operating Temperature=155°C, Max Power Dissipation=100mW, Min Operating Temperature=-55°C, Package Quantity=1, Resistance=2.2kR, Resistance Tolerance=1%, Resistor Type="Thick Film", Temperature Coefficient=100ppm/°C, Voltage Rating=50V, Case/Package=0603, Category="Chip SMD Resistors", Construction=Rectangular, Depth=0.8mm, Features="Moisture Resistant", Height=0.022inch, Item Type=Resistor, Lead Free="Lead Free", Length=1.6mm, Manufacturer Part Number=RC0603FR-072K2L, Military Standard=Not, Number of Terminations=2, Packaging="Tape and Reel", Power Rating=100mW, Pricing 1="5000=0.00133, 10000=0.00131, 20000=0.00127 (USD)", RoHS=Yes, RoHS Compliant=Yes, Series=RC, Size Code=0603, Stock 1=733100, Supplier 1=Avnet, Supplier Part Number 1=RC0603FR-072K2L, Termination=SMD/SMT, Tolerance=1%, Width=0.031inch
R4 R5 R6 R7 R10 R11 R12 R13: library part RC0402FR-0710KL, "RES 10K OHM 1% 1/16W 0402", Case Code (Imperial)=0402, Case Code (Metric)=1005, LCSC Part Number=C60490, Manufacturer=Yageo, Max Operating Temperature=155°C, Max Power Dissipation=63mW, Min Operating Temperature=-55°C, Power Rating=62.5mW, Resistance=10kR, Resistance Tolerance=1%, Resistor Type="Thick Film", Supplier Part Number 1=603-RC0402FR-0710KL, Temperature Coefficient=100ppm/°C, Voltage Rating=50V, Case/Package=0402, Category="Chip SMD Resistors", ComponentLink1Description=https://datasheet.ciiva.com/7660/38568-7660787.pdf?src-supplier=Element14, ComponentLink1URL=https://datasheet.ciiva.com/7660/38568-7660787.pdf?src-supplier=Element14, ComponentLink2Description=https://datasheet.ciiva.com/7849/1686128-7849814.pdf?src-supplier=Element14, ComponentLink2URL=https://datasheet.ciiva.com/7849/1686128-7849814.pdf?src-supplier=Element14, ComponentLink3Description=https://datasheet.ciiva.com/7983/1018594-7983486.pdf?src-supplier=Element14, ComponentLink3URL=https://datasheet.ciiva.com/7983/1018594-7983486.pdf?src-supplier=Element14, ComponentLink4Description=https://datasheet.ciiva.com/22747/1018594-22747512.pdf?src-supplier=Element14, ComponentLink4URL=https://datasheet.ciiva.com/22747/1018594-22747512.pdf?src-supplier=Element14, ComponentLink5Description=https://datasheet.ciiva.com/12667/pyu-rc0402-51-rohs-l-6-r-12667067.pdf?src-supplier=Mouser, ComponentLink5URL=https://datasheet.ciiva.com/12667/pyu-rc0402-51-rohs-l-6-r-12667067.pdf?src-supplier=Mouser, ComponentLink6Description=https://datasheet.ciiva.com/7849/1784430-7849813.pdf?src-supplier=Element14, ComponentLink6URL=https://datasheet.ciiva.com/7849/1784430-7849813.pdf?src-supplier=Element14, ComponentLink7Description=https://datasheet.ciiva.com/7849/1784430-7849815.pdf?src-supplier=Element14, ComponentLink7URL=https://datasheet.ciiva.com/7849/1784430-7849815.pdf?src-supplier=Element14, Construction=Rectangular, Depth=0.5mm, Features="Moisture Resistant", Height=0.32mm, Item Type=Resistor, Lead Free="Lead Free", Lead Pitch=0.2mm, Length=1mm, Manufacturer Part Number=RC0402FR-0710KL, Military Standard=Not, Number of Pins=2, Number of Terminations=2, Packaging="Tape and Reel", Pricing 1="1=0.10000, 10=0.01400, 50=0.01400, 100=0.00500, 1000=0.00300, 10000=0.00200 (USD)", REACH SVHC="No SVHC", RoHS=Yes, RoHS Compliant=Yes, Series=RC, Stock 1=18648329, Supplier 1=Mouser, Termination=SMD/SMT, Tolerance=1%, Voltage Rating (DC)=50V, Width=0.5mm, Working Voltage=50V
R17: library part RC0603FR-07470RL, "RES 470 OHM 1% 1/10W 0603", Case Code (Imperial)=0603, Case Code (Metric)=1608, LCSC Part Number=C114669, Manufacturer=Yageo, Max Operating Temperature=155°C, Max Power Dissipation=100mW, Min Operating Temperature=-55°C, Package Quantity=1, Resistance Tolerance=1%, Resistor Type="Thick Film", Supplier Part Number 1=311-470HRCT-ND, Temperature Coefficient=100ppm/°C, Voltage Rating=50V, Working Voltage=75V, Case/Package=0603, Category="Chip SMD Resistors", ComponentLink1Description=https://datasheet.ciiva.com/11808/0900766b80f96399-11808177.pdf?src-supplier=RSComponents, ComponentLink1URL=https://datasheet.ciiva.com/11808/0900766b80f96399-11808177.pdf?src-supplier=RSComponents, ComponentLink2Description=https://datasheet.ciiva.com/7746/1738695-7746359.pdf?src-supplier=Element14, ComponentLink2URL=https://datasheet.ciiva.com/7746/1738695-7746359.pdf?src-supplier=Element14, ComponentLink3Description=https://datasheet.ciiva.com/7746/1738695-7746360.pdf?src-supplier=Element14, ComponentLink3URL=https://datasheet.ciiva.com/7746/1738695-7746360.pdf?src-supplier=Element14, ComponentLink4Description=https://datasheet.ciiva.com/7660/1868787-7660793.pdf?src-supplier=Element14, ComponentLink4URL=https://datasheet.ciiva.com/7660/1868787-7660793.pdf?src-supplier=Element14, ComponentLink5Description=https://datasheet.ciiva.com/46440/1868787-46440907.pdf?src-supplier=Element14, ComponentLink5URL=https://datasheet.ciiva.com/46440/1868787-46440907.pdf?src-supplier=Element14, ComponentLink6Description=https://datasheet.ciiva.com/2454/pyu-r-int-thick-7-2454012.pdf?src-supplier=Digi-Key, ComponentLink6URL=https://datasheet.ciiva.com/2454/pyu-r-int-thick-7-2454012.pdf?src-supplier=Digi-Key, ComponentLink7Description=https://datasheet.ciiva.com/2454/pyu-r-int-thick-7-2454013.pdf?src-supplier=Digi-Key, ComponentLink7URL=https://datasheet.ciiva.com/2454/pyu-r-int-thick-7-2454013.pdf?src-supplier=Digi-Key, ComponentLink8Description=https://datasheet.ciiva.com/2454/pyu-r-int-thick-7-2454014.pdf?src-supplier=Digi-Key, ComponentLink8URL=https://datasheet.ciiva.com/2454/pyu-r-int-thick-7-2454014.pdf?src-supplier=Digi-Key, Construction=Rectangular, Depth=0.8mm, Features="Moisture Resistant", Height=0.022inch, Lead Free="Lead Free", Length=1.6mm, Manufacturer Part Number=RC0603FR-07470RL, Military Standard=Not, Number of Terminations=2, Packaging="Tape and Reel", Power Rating=100mW, Pricing 1="1=0.10000, 10=0.02400, 100=0.00970, 1000=0.00436, 2500=0.00378 (USD)", REACH SVHC="No SVHC", Resistance=470R, RoHS=Yes, RoHS Compliant=Yes, Series=RC, Stock 1=154083, Supplier 1=Digi-Key, Technology="THICK FILM", Termination=SMD/SMT, Tolerance=1%, Width=0.031inch
TP1: "Wire Connecting Pad", Item Type="Test Point", Manufacturer Part Number="2 Test Pad"
U1: "SOT-223 Linear Voltage Regulators (LDO) ROHS", LCSC Part Number=C2992570, Manufacturer="GUOXIN JIAPIN SEMICONDUCTOR", Package=SOT-223, ComponentLink1Description=LCSC, ComponentLink1URL=https://www.lcsc.com/product-detail/Linear-Voltage-Regulators-LDO_GUOXIN-JIAPIN-SEMICONDUCTOR-AMS1117-3-3_C2992570.html, Item Type=IC, Manufacturer Part Number=AMS1117-3.3
U2: "RF TXRX MOD BT WIFI PCB TH SMD", Manufacturer="Espressif Systems", Supplier Part Number=1965-ESP32-C6-WROOM-1U-N8CT-ND, ComponentLink1Description=https://datasheet.octopart.com/ESP32-C6-WROOM-1U-N8-Espressif-Systems-datasheet-188867345.pdf?src-supplier=TME, ComponentLink1URL=https://datasheet.octopart.com/ESP32-C6-WROOM-1U-N8-Espressif-Systems-datasheet-188867345.pdf?src-supplier=TME, Item Type=Module, Manufacturer Part Number=ESP32-C6-WROOM-1U-N8, Pricing="1=5.43, 10=4.698, 25=4.444, 100=4.0954, 250=3.88644 (USD)", RoHS=No, Stock=1394, Supplier=Digikey
U3: "SENSOR OPT AMBIENT 4 SMD J LEAD", Case/Package=SMD/SMT, LCSC Part Number=C1850416, Manufacturer="Vishay Semiconductors", Max Supply Voltage (DC)=3.6V, Min Supply Voltage (DC)=2.5V, Output Current=3mA, ComponentLink1Description=http://www.farnell.com/datasheets/2118175.pdf?_ga=2.74067602.1265931949.1503988629-1413671594.1503025027&src-supplier=Farnell, ComponentLink1URL=http://www.farnell.com/datasheets/2118175.pdf?_ga=2.74067602.1265931949.1503988629-1413671594.1503025027&src-supplier=Farnell, ComponentLink2Description=http://www.farnell.com/datasheets/2118175.pdf?src-supplier=Element14, ComponentLink2URL=http://www.farnell.com/datasheets/2118175.pdf?src-supplier=Element14, ComponentLink3Description=http://www.farnell.com/datasheets/2118175.pdf?_ga=2.74067602.1265931949.1503988629-1413671594.1503025027&src-supplier=Newark, ComponentLink3URL=http://www.farnell.com/datasheets/2118175.pdf?_ga=2.74067602.1265931949.1503988629-1413671594.1503025027&src-supplier=Newark, ComponentLink4Description=http://www.vishay.com/docs/84286/veml7700.pdf?src-supplier=Digikey, ComponentLink4URL=http://www.vishay.com/docs/84286/veml7700.pdf?src-supplier=Digikey, Item Type=Sensors, Manufacturer Part Number=VEML7700-TT, Mounting Technology="Surface Mount", Packaging="Tape and Reel", Pricing="1=1.85, 10=1.26, 50=1.26, 100=0.955, 1000=0.772, 10000=0.667 (USD)", Reach SVHC Compliant=No, RoHS=Yes, RoHS Compliant=Yes, Stock=116827, Supplier=Mouser
U4: "IC BUF NON-INVERT 5.5V SOT23-5", Case/Package=SOT-23-5, High Level Output Current=-8mA, LCSC Part Number=C100024, Low Level Output Current=8mA, Manufacturer="Texas Instruments", Max Operating Temperature=125°C, Max Supply Voltage=5.5V, Min Operating Temperature=-40°C, Min Supply Voltage=1.6V, Package Quantity=3000, Quiescent Current=1uA, Supplier Part Number 1=296-37176-6-ND, ComponentLink1Description=http://www.ti.com/lit/pdf/sdyu001?src-supplier=Digi-Key, ComponentLink1URL=http://www.ti.com/lit/pdf/sdyu001?src-supplier=Digi-Key, ComponentLink2Description=http://www.ti.com/lit/ds/symlink/sn74lv1t34.pdf?src-supplier=Avnet, ComponentLink2URL=http://www.ti.com/lit/ds/symlink/sn74lv1t34.pdf?src-supplier=Avnet, Item Type=IC, Lead Free="Lead Free", Logic Function=Buffer,Inverting, Manufacturer Part Number=SN74LV1T34DBVR, Mount="Surface Mount", Number of Bits=1, Number of Bits per Element=1, Number of Channels=1, Number of Elements=1, Number of Input Lines=1, Number of Inputs=1, Number of Output Lines=1, Number of Outputs=1, Number of Pins=5, Operating Supply Current=8mA, Packaging="Tape and Reel", Polarity=Non-Inverting, Pricing 1="1=0.43, 10=0.349, 25=0.3192, 100=0.2374, 250=0.2152, 500=0.17808, 1000=0.13356 (USD)", Propagation Delay=15.5ns, Radiation Hardening=No, REACH SVHC="No SVHC", RoHS Compliant=Yes, Stock 1=37360, Supplier 1=Digi-Key, Weight=0.000353oz
U5: "SOP-8 Position Sensors ROHS", LCSC Part Number=C5451785, Manufacturer="Magn Tek", Package=SOP-8, ComponentLink1Description=LCSC, ComponentLink1URL=https://www.lcsc.com/product-detail/Position-Sensors_Magn-Tek-MT6701CT-STD_C5451785.html?s_z=n_mt6701ct, Item Type=Sensor, Manufacturer Part Number=MT6701CT-STD
U6: "BLDC MOTOR DRIVER 2-11V QFN20", LCSC Part Number=C5274455, Manufacturer=Trinamic, Item Type=IC, Manufacturer Part Number=TMC6300-LA-T, Pricing="1=3.73, 10=2.47, 50=2.11, 100=1.71, 1000=1.28, 10000=1.15 (USD)", RoHS=No, Series=-, Supplier=Mouser
U7: "SOT-23-6L Touch Sensors ROHS", LCSC Part Number=C2890349, Manufacturer="Tontek Design Tech", Package=SOT-23-6L, ComponentLink1Description=LCSC, ComponentLink1URL=https://www.lcsc.com/product-detail/Touch-Sensors_Tontek-Design-Tech-TTP233H-BA6_C2890349.html, Item Type=IC, Manufacturer Part Number=TTP233H-BA6

## Free pads (board coordinates)
  round 0 hole 122.05: 10(2543.12,1672.07) MH1(-25.69,3203.89) MH1(0,0) MH1(997.93,4985.39) MH1(1823.72,4984.4) MH1(2846.36,3203.89) MH2(2807.96,0)
  round 0 / inner round 60 / far side round 0 hole 122.05: 11(264.83,1672.07)

## Via types
v1: diameter 23.62, hole 11.81, Top Layer to Bottom Layer, tented both sides, 208 vias

## Nets (pads, with @x,y where several pads share a name; then routed paths per layer and width w, separated by ;. In a path a pad name is that pad's centre, name@x,y a point inside that pad or via, vN(x,y) a via of type N, cw(c..) or ccw(c..) an arc to the next point about the centre after c; other vN are vias at no path point)
3V3: C3.2 C4.2 C5.2 C6.2 C8.2 C19.2 C22.2 C40.1 R1.2 R2.2 R3.2 R4.1 R5.1 R6.1 R7.2 R8.2 R9.2 R10.1 R11.1 R12.1 R13.2 R18.1 R20.1 U1.2 U1.4 U2.2 U3.2 U5.1 U6.11 U7.5 | length 4256
  Top Layer w15: v1@943.29,1875.02 cw(c947.14,1875.02) v1(947.14,1878.86) 947.14,1713.06 v1(947.6,1713.06)
  Top Layer w25: v1(1251.42,841.41) U5.1@1301.59,841.41 ; v1@1385.28,2856.8 U3.2@1385.28,4313.31
  Bottom Layer w7: U6.11@296.69,1462.6 360.41,1462.6 ccw(c360.41,1470.4) C22.2@368.2,1470.4